# Altium PCB K601-6252双模带屏 VER 1.1 2026 10 16.PcbDoc (part 3 of 12)
Units mm, origin at the board's own origin, x right, y up, seen from the top; angles counter-clockwise.
Board outline 75.02 x 25.73 mm, 2 copper layers (Top Layer, Bottom Layer); 43 components, 67 nets, 219 pads, 157 vias.
Unrouted connection lines stored in the file: 1.
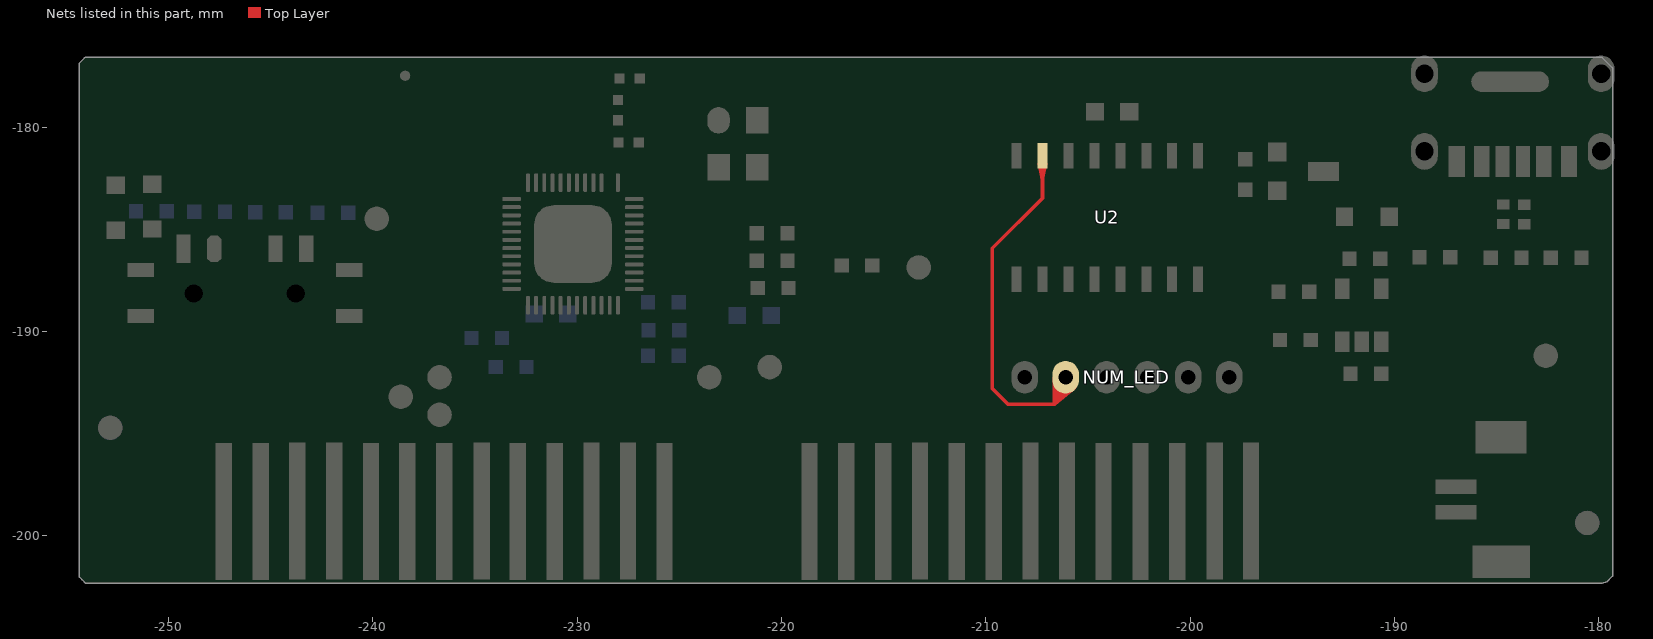
[diagram p3: the nets of this part, all layers, seen from the top]

## Via types
v1: diameter 0.6, hole 0.4, Top Layer to Bottom Layer, tented both sides, 154 vias
v2: diameter 0.6, hole 0.4, Top Layer to Bottom Layer, 3 vias

## Nets (pads, with @x,y where several pads share a name; then routed paths per layer and width w, separated by ;. In a path a pad name is that pad's centre, name@x,y a point inside that pad or via, vN(x,y) a via of type N, cw(c..) or ccw(c..) an arc to the next point about the centre after c; other vN are vias at no path point) (continued)
LED1: (continued)
  Top Layer w0.18: U2.7@-207.225,-181.398 -207.225,-183.482 -209.675,-185.932 -209.675,-192.798 -208.911,-193.562 -206.64,-193.562 ; NUM_LED.5@-206.091,-192.242 -206.091,-193.014 -206.64,-193.562 ; NUM_LED.5@-205.649,-192.736 -206.631,-193.541 ; U2.7@-207.379,-181.793 -207.225,-182.563 ; U2.7@-207.379,-181.793 -207.225,-182.563 ; U2.7@-207.379,-181.793 -207.225,-182.563 ; U2.7@-207.379,-181.793 -207.225,-182.563 ; U2.7@-207.379,-181.793 -207.225,-182.563 ; -207.225,-182.563 U2.7@-207.071,-181.793 ; -207.225,-182.563 U2.7@-207.225,-181.778 ; -207.225,-182.563 U2.7@-207.071,-181.793 ; -207.225,-182.563 U2.7@-207.225,-181.778 ; -207.225,-182.563 U2.7@-207.071,-181.793 ; -207.225,-182.563 U2.7@-207.225,-181.778 ; -207.225,-182.563 U2.7@-207.071,-181.793 ; -207.225,-182.563 U2.7@-207.225,-181.778 ; -207.225,-182.563 U2.7@-207.071,-181.793 ; -207.225,-182.563 U2.7@-207.225,-181.778 ; -206.64,-193.562 NUM_LED.5@-205.647,-192.733 ; -206.64,-193.562 NUM_LED.5@-206.638,-192.269 ; -206.64,-193.562 NUM_LED.5@-205.774,-192.602 ; -206.64,-193.562 NUM_LED.5@-206.455,-192.283 ; -206.64,-193.562 NUM_LED.5@-205.917,-192.49 ; -206.64,-193.562 NUM_LED.5@-206.278,-192.321 ; -206.64,-193.562 NUM_LED.5@-206.091,-192.392 ; -206.64,-193.562 NUM_LED.5@-205.647,-192.733 ; -206.64,-193.562 NUM_LED.5@-206.638,-192.269 ; -206.64,-193.562 NUM_LED.5@-205.774,-192.602 ; -206.64,-193.562 NUM_LED.5@-206.455,-192.283 ; -206.64,-193.562 NUM_LED.5@-205.917,-192.49 ; -206.64,-193.562 NUM_LED.5@-206.278,-192.321 ; -206.64,-193.562 NUM_LED.5@-206.091,-192.392 ; -206.64,-193.562 NUM_LED.5@-205.647,-192.733 ; -206.64,-193.562 NUM_LED.5@-206.638,-192.269 ; -206.64,-193.562 NUM_LED.5@-205.774,-192.602 ; -206.64,-193.562 NUM_LED.5@-206.455,-192.283 ; -206.64,-193.562 NUM_LED.5@-205.917,-192.49 ; -206.64,-193.562 NUM_LED.5@-206.278,-192.321 ; -206.64,-193.562 NUM_LED.5@-206.091,-192.392 ; -206.64,-193.562 NUM_LED.5@-205.647,-192.733 ; -206.64,-193.562 NUM_LED.5@-206.638,-192.269 ; -206.64,-193.562 NUM_LED.5@-205.774,-192.602 ; -206.64,-193.562 NUM_LED.5@-206.455,-192.283 ; -206.64,-193.562 NUM_LED.5@-205.917,-192.49 ; -206.64,-193.562 NUM_LED.5@-206.278,-192.321 ; -206.64,-193.562 NUM_LED.5@-206.091,-192.392 ; -206.64,-193.562 NUM_LED.5@-205.647,-192.733 ; -206.64,-193.562 NUM_LED.5@-206.638,-192.269 ; -206.64,-193.562 NUM_LED.5@-205.774,-192.602 ; -206.64,-193.562 NUM_LED.5@-206.455,-192.283 ; -206.64,-193.562 NUM_LED.5@-205.917,-192.49 ; -206.64,-193.562 NUM_LED.5@-206.278,-192.321 ; -206.64,-193.562 NUM_LED.5@-206.091,-192.392 ; -206.64,-193.562 NUM_LED.5@-205.647,-192.733 ; -206.64,-193.562 NUM_LED.5@-206.638,-192.269 ; -206.64,-193.562 NUM_LED.5@-205.774,-192.602 ; -206.64,-193.562 NUM_LED.5@-206.455,-192.283 ; -206.64,-193.562 NUM_LED.5@-205.917,-192.49 ; -206.64,-193.562 NUM_LED.5@-206.278,-192.321 ; -206.64,-193.562 NUM_LED.5@-206.091,-192.392 ; -206.64,-193.562 NUM_LED.5@-205.647,-192.733 ; -206.64,-193.562 NUM_LED.5@-206.638,-192.269 ; -206.64,-193.562 NUM_LED.5@-205.774,-192.602 ; -206.64,-193.562 NUM_LED.5@-206.455,-192.283 ; -206.64,-193.562 NUM_LED.5@-205.917,-192.49 ; -206.64,-193.562 NUM_LED.5@-206.278,-192.321 ; -206.64,-193.562 NUM_LED.5@-206.091,-192.392 ; -206.64,-193.562 NUM_LED.5@-205.647,-192.733 ; -206.64,-193.562 NUM_LED.5@-206.638,-192.269 ; -206.64,-193.562 NUM_LED.5@-205.774,-192.602 ; -206.64,-193.562 NUM_LED.5@-206.455,-192.283 ; -206.64,-193.562 NUM_LED.5@-205.917,-192.49 ; -206.64,-193.562 NUM_LED.5@-206.278,-192.321 ; -206.64,-193.562 NUM_LED.5@-206.091,-192.392 ; -206.64,-193.562 NUM_LED.5@-205.647,-192.733 ; -206.64,-193.562 NUM_LED.5@-206.638,-192.269 ; -206.64,-193.562 NUM_LED.5@-205.774,-192.602 ; -206.64,-193.562 NUM_LED.5@-206.455,-192.283 ; -206.64,-193.562 NUM_LED.5@-205.917,-192.49 ; -206.64,-193.562 NUM_LED.5@-206.278,-192.321 ; -206.64,-193.562 NUM_LED.5@-206.091,-192.392 ; -206.64,-193.562 NUM_LED.5@-205.647,-192.733 ; -206.64,-193.562 NUM_LED.5@-206.638,-192.269 ; -206.64,-193.562 NUM_LED.5@-205.774,-192.602 ; -206.64,-193.562 NUM_LED.5@-206.455,-192.283 ; -206.64,-193.562 NUM_LED.5@-205.917,-192.49 ; -206.64,-193.562 NUM_LED.5@-206.278,-192.321 ; -206.64,-193.562 NUM_LED.5@-206.091,-192.392 ; -206.64,-193.562 NUM_LED.5@-205.647,-192.733 ; -206.64,-193.562 NUM_LED.5@-206.638,-192.269 ; -206.64,-193.562 NUM_LED.5@-205.774,-192.602 ; -206.64,-193.562 NUM_LED.5@-206.455,-192.283 ; -206.64,-193.562 NUM_LED.5@-205.917,-192.49 ; -206.64,-193.562 NUM_LED.5@-206.278,-192.321 ; -206.64,-193.562 NUM_LED.5@-206.091,-192.392 ; -206.64,-193.562 NUM_LED.5@-205.647,-192.733 ; -206.64,-193.562 NUM_LED.5@-206.638,-192.269 ; -206.64,-193.562 NUM_LED.5@-205.774,-192.602 ; -206.64,-193.562 NUM_LED.5@-206.455,-192.283 ; -206.64,-193.562 NUM_LED.5@-205.917,-192.49 ; -206.64,-193.562 NUM_LED.5@-206.278,-192.321 ; -206.64,-193.562 NUM_LED.5@-206.091,-192.392 ; -206.64,-193.562 NUM_LED.5@-205.647,-192.733 ; -206.64,-193.562 NUM_LED.5@-206.638,-192.269 ; -206.64,-193.562 NUM_LED.5@-205.774,-192.602 ; -206.64,-193.562 NUM_LED.5@-206.455,-192.283 ; -206.64,-193.562 NUM_LED.5@-205.917,-192.49 ; -206.64,-193.562 NUM_LED.5@-206.278,-192.321 ; -206.64,-193.562 NUM_LED.5@-206.091,-192.392 ; -206.64,-193.562 NUM_LED.5@-205.647,-192.733 ; -206.64,-193.562 NUM_LED.5@-206.638,-192.269 ; -206.64,-193.562 NUM_LED.5@-205.774,-192.602 ; -206.64,-193.562 NUM_LED.5@-206.455,-192.283 ; -206.64,-193.562 NUM_LED.5@-205.917,-192.49 ; -206.64,-193.562 NUM_LED.5@-206.278,-192.321 ; -206.64,-193.562 NUM_LED.5@-206.091,-192.392 ; -206.64,-193.562 NUM_LED.5@-205.647,-192.733 ; -206.64,-193.562 NUM_LED.5@-206.638,-192.269 ; -206.64,-193.562 NUM_LED.5@-205.774,-192.602 ; -206.64,-193.562 NUM_LED.5@-206.455,-192.283 ; -206.64,-193.562 NUM_LED.5@-205.917,-192.49 ; -206.64,-193.562 NUM_LED.5@-206.278,-192.321 ; -206.64,-193.562 NUM_LED.5@-206.091,-192.392 ; -206.64,-193.562 NUM_LED.5@-205.647,-192.733 ; -206.64,-193.562 NUM_LED.5@-206.638,-192.269 ; -206.64,-193.562 NUM_LED.5@-205.774,-192.602 ; -206.64,-193.562 NUM_LED.5@-206.455,-192.283 ; -206.64,-193.562 NUM_LED.5@-205.917,-192.49 ; -206.64,-193.562 NUM_LED.5@-206.278,-192.321 ; -206.64,-193.562 NUM_LED.5@-206.091,-192.392 ; -206.64,-193.562 NUM_LED.5@-205.647,-192.733 ; -206.64,-193.562 NUM_LED.5@-206.638,-192.269 ; -206.64,-193.562 NUM_LED.5@-205.774,-192.602 ; -206.64,-193.562 NUM_LED.5@-206.455,-192.283 ; -206.64,-193.562 NUM_LED.5@-205.917,-192.49 ; -206.64,-193.562 NUM_LED.5@-206.278,-192.321 ; -206.64,-193.562 NUM_LED.5@-206.091,-192.392 ; -206.64,-193.562 NUM_LED.5@-205.647,-192.733 ; -206.64,-193.562 NUM_LED.5@-206.638,-192.269 ; -206.64,-193.562 NUM_LED.5@-205.774,-192.602 ; -206.64,-193.562 NUM_LED.5@-206.455,-192.283 ; -206.64,-193.562 NUM_LED.5@-205.917,-192.49 ; -206.64,-193.562 NUM_LED.5@-206.278,-192.321 ; -206.64,-193.562 NUM_LED.5@-206.091,-192.392 ; -206.64,-193.562 NUM_LED.5@-205.647,-192.733 ; -206.64,-193.562 NUM_LED.5@-206.638,-192.269 ; -206.64,-193.562 NUM_LED.5@-205.774,-192.602 ; -206.64,-193.562 NUM_LED.5@-206.455,-192.283 ; -206.64,-193.562 NUM_LED.5@-205.917,-192.49 ; -206.64,-193.562 NUM_LED.5@-206.278,-192.321 ; -206.64,-193.562 NUM_LED.5@-206.091,-192.392 ; -206.64,-193.562 NUM_LED.5@-205.647,-192.733 ; -206.64,-193.562 NUM_LED.5@-206.638,-192.269 ; -206.64,-193.562 NUM_LED.5@-205.774,-192.602 ; -206.64,-193.562 NUM_LED.5@-206.455,-192.283 ; -206.64,-193.562 NUM_LED.5@-205.917,-192.49 ; -206.64,-193.562 NUM_LED.5@-206.278,-192.321 ; -206.64,-193.562 NUM_LED.5@-206.091,-192.392 ; -206.64,-193.562 NUM_LED.5@-205.647,-192.733 ; -206.64,-193.562 NUM_LED.5@-206.638,-192.269 ; -206.64,-193.562 NUM_LED.5@-205.774,-192.602 ; -206.64,-193.562 NUM_LED.5@-206.455,-192.283 ; -206.64,-193.562 NUM_LED.5@-205.917,-192.49 ; -206.64,-193.562 NUM_LED.5@-206.278,-192.321 ; -206.64,-193.562 NUM_LED.5@-206.091,-192.392 ; -206.64,-193.562 NUM_LED.5@-205.647,-192.733 ; -206.64,-193.562 NUM_LED.5@-206.638,-192.269 ; -206.64,-193.562 NUM_LED.5@-205.774,-192.602 ; -206.64,-193.562 NUM_LED.5@-206.455,-192.283 ; -206.64,-193.562 NUM_LED.5@-205.917,-192.49 ; -206.64,-193.562 NUM_LED.5@-206.278,-192.321 ; -206.64,-193.562 NUM_LED.5@-206.091,-192.392 ; -206.64,-193.562 NUM_LED.5@-205.647,-192.733 ; -206.64,-193.562 NUM_LED.5@-206.638,-192.269 ; -206.64,-193.562 NUM_LED.5@-205.774,-192.602 ; -206.64,-193.562 NUM_LED.5@-206.455,-192.283 ; -206.64,-193.562 NUM_LED.5@-205.917,-192.49 ; -206.64,-193.562 NUM_LED.5@-206.278,-192.321 ; -206.64,-193.562 NUM_LED.5@-206.091,-192.392 ; -206.64,-193.562 NUM_LED.5@-205.647,-192.733 ; -206.64,-193.562 NUM_LED.5@-206.638,-192.269 ; -206.64,-193.562 NUM_LED.5@-205.774,-192.602 ; -206.64,-193.562 NUM_LED.5@-206.455,-192.283 ; -206.64,-193.562 NUM_LED.5@-205.917,-192.49 ; -206.64,-193.562 NUM_LED.5@-206.278,-192.321 ; -206.64,-193.562 NUM_LED.5@-206.091,-192.392 ; -206.64,-193.562 NUM_LED.5@-205.647,-192.733 ; -206.64,-193.562 NUM_LED.5@-206.638,-192.269 ; -206.64,-193.562 NUM_LED.5@-205.774,-192.602 ; -206.64,-193.562 NUM_LED.5@-206.455,-192.283 ; -206.64,-193.562 NUM_LED.5@-205.917,-192.49 ; -206.64,-193.562 NUM_LED.5@-206.278,-192.321 ; -206.64,-193.562 NUM_LED.5@-206.091,-192.392 ; -206.64,-193.562 NUM_LED.5@-205.647,-192.733 ; -206.64,-193.562 NUM_LED.5@-206.638,-192.269 ; -206.64,-193.562 NUM_LED.5@-205.774,-192.602 ; -206.64,-193.562 NUM_LED.5@-206.455,-192.283 ; -206.64,-193.562 NUM_LED.5@-205.917,-192.49 ; -206.64,-193.562 NUM_LED.5@-206.278,-192.321 ; -206.64,-193.562 NUM_LED.5@-206.091,-192.392 ; -206.64,-193.562 NUM_LED.5@-205.647,-192.733 ; -206.64,-193.562 NUM_LED.5@-206.638,-192.269 ; -206.64,-193.562 NUM_LED.5@-205.774,-192.602 ; -206.64,-193.562 NUM_LED.5@-206.455,-192.283 ; -206.64,-193.562 NUM_LED.5@-205.917,-192.49 ; -206.64,-193.562 NUM_LED.5@-206.278,-192.321 ; -206.64,-193.562 NUM_LED.5@-206.091,-192.392 ; -206.64,-193.562 NUM_LED.5@-205.647,-192.733 ; -206.64,-193.562 NUM_LED.5@-206.638,-192.269 ; -206.64,-193.562 NUM_LED.5@-205.774,-192.602 ; -206.64,-193.562 NUM_LED.5@-206.455,-192.283 ; -206.64,-193.562 NUM_LED.5@-205.917,-192.49 ; -206.64,-193.562 NUM_LED.5@-206.278,-192.321 ; -206.64,-193.562 NUM_LED.5@-206.091,-192.392 ; -206.64,-193.562 NUM_LED.5@-205.647,-192.733 ; -206.64,-193.562 NUM_LED.5@-206.638,-192.269 ; -206.64,-193.562 NUM_LED.5@-205.774,-192.602 ; -206.64,-193.562 NUM_LED.5@-206.455,-192.283 ; -206.64,-193.562 NUM_LED.5@-205.917,-192.49 ; -206.64,-193.562 NUM_LED.5@-206.278,-192.321 ; -206.64,-193.562 NUM_LED.5@-206.091,-192.392 ; -206.64,-193.562 NUM_LED.5@-205.647,-192.733 ; -206.64,-193.562 NUM_LED.5@-206.638,-192.269 ; -206.64,-193.562 NUM_LED.5@-205.774,-192.602 ; -206.64,-193.562 NUM_LED.5@-206.455,-192.283 ; -206.64,-193.562 NUM_LED.5@-205.917,-192.49 ; -206.64,-193.562 NUM_LED.5@-206.278,-192.321 ; -206.64,-193.562 NUM_LED.5@-206.091,-192.392 ; -206.64,-193.562 NUM_LED.5@-205.647,-192.733 ; -206.64,-193.562 NUM_LED.5@-206.638,-192.269 ; -206.64,-193.562 NUM_LED.5@-205.774,-192.602 ; -206.64,-193.562 NUM_LED.5@-206.455,-192.283 ; -206.64,-193.562 NUM_LED.5@-205.917,-192.49 ; -206.64,-193.562 NUM_LED.5@-206.278,-192.321 ; -206.64,-193.562 NUM_LED.5@-206.091,-192.392 ; -206.64,-193.562 NUM_LED.5@-205.647,-192.733 ; -206.64,-193.562 NUM_LED.5@-206.638,-192.269 ; -206.64,-193.562 NUM_LED.5@-205.774,-192.602 ; -206.64,-193.562 NUM_LED.5@-206.455,-192.283 ; -206.64,-193.562 NUM_LED.5@-205.917,-192.49 ; -206.64,-193.562 NUM_LED.5@-206.278,-192.321 ; -206.64,-193.562 NUM_LED.5@-206.091,-192.392 ; -206.64,-193.562 NUM_LED.5@-205.647,-192.733 ; -206.64,-193.562 NUM_LED.5@-206.638,-192.269 ; -206.64,-193.562 NUM_LED.5@-205.774,-192.602 ; -206.64,-193.562 NUM_LED.5@-206.455,-192.283 ; -206.64,-193.562 NUM_LED.5@-205.917,-192.49 ; -206.64,-193.562 NUM_LED.5@-206.278,-192.321 ; -206.64,-193.562 NUM_LED.5@-206.091,-192.392 ; -206.64,-193.562 NUM_LED.5@-205.647,-192.733 ; -206.64,-193.562 NUM_LED.5@-206.638,-192.269 ; -206.64,-193.562 NUM_LED.5@-205.774,-192.602 ; -206.64,-193.562 NUM_LED.5@-206.455,-192.283 ; -206.64,-193.562 NUM_LED.5@-205.917,-192.49 ; -206.64,-193.562 NUM_LED.5@-206.278,-192.321 ; -206.64,-193.562 NUM_LED.5@-206.091,-192.392 ; -206.64,-193.562 NUM_LED.5@-205.647,-192.733 ; -206.64,-193.562 NUM_LED.5@-206.638,-192.269 ; -206.64,-193.562 NUM_LED.5@-205.774,-192.602 ; -206.64,-193.562 NUM_LED.5@-206.455,-192.283 ; -206.64,-193.562 NUM_LED.5@-205.917,-192.49 ; -206.64,-193.562 NUM_LED.5@-206.278,-192.321 ; -206.64,-193.562 NUM_LED.5@-206.091,-192.392 ; -206.64,-193.562 NUM_LED.5@-205.647,-192.733 ; -206.64,-193.562 NUM_LED.5@-206.638,-192.269 ; -206.64,-193.562 NUM_LED.5@-205.774,-192.602 ; -206.64,-193.562 NUM_LED.5@-206.455,-192.283 ; -206.64,-193.562 NUM_LED.5@-205.917,-192.49 ; -206.64,-193.562 NUM_LED.5@-206.278,-192.321 ; -206.64,-193.562 NUM_LED.5@-206.091,-192.392 ; -206.64,-193.562 NUM_LED.5@-205.647,-192.733 ; -206.64,-193.562 NUM_LED.5@-206.638,-192.269 ; -206.64,-193.562 NUM_LED.5@-205.774,-192.602 ; -206.64,-193.562 NUM_LED.5@-206.455,-192.283 ; -206.64,-193.562 NUM_LED.5@-205.917,-192.49 ; -206.64,-193.562 NUM_LED.5@-206.278,-192.321 ; -206.64,-193.562 NUM_LED.5@-206.091,-192.392 ; -206.64,-193.562 NUM_LED.5@-205.647,-192.733 ; -206.64,-193.562 NUM_LED.5@-206.638,-192.269 ; -206.64,-193.562 NUM_LED.5@-205.774,-192.602 ; -206.64,-193.562 NUM_LED.5@-206.455,-192.283 ; -206.64,-193.562 NUM_LED.5@-205.917,-192.49 ; -206.64,-193.562 NUM_LED.5@-206.278,-192.321 ; -206.64,-193.562 NUM_LED.5@-206.091,-192.392 ; -206.64,-193.562 NUM_LED.5@-205.647,-192.733 ; -206.64,-193.562 NUM_LED.5@-206.638,-192.269 ; -206.64,-193.562 NUM_LED.5@-205.774,-192.602 ; -206.64,-193.562 NUM_LED.5@-206.455,-192.283 ; -206.64,-193.562 NUM_LED.5@-205.917,-192.49 ; -206.64,-193.562 NUM_LED.5@-206.278,-192.321 ; -206.64,-193.562 NUM_LED.5@-206.091,-192.392 ; -206.64,-193.562 NUM_LED.5@-205.647,-192.733 ; -206.64,-193.562 NUM_LED.5@-206.638,-192.269 ; -206.64,-193.562 NUM_LED.5@-205.774,-192.602 ; -206.64,-193.562 NUM_LED.5@-206.455,-192.283 ; -206.64,-193.562 NUM_LED.5@-205.917,-192.49 ; -206.64,-193.562 NUM_LED.5@-206.278,-192.321 ; -206.64,-193.562 NUM_LED.5@-206.091,-192.392 ; -206.64,-193.562 NUM_LED.5@-205.647,-192.733 ; -206.64,-193.562 NUM_LED.5@-206.638,-192.269 ; -206.64,-193.562 NUM_LED.5@-205.774,-192.602 ; -206.64,-193.562 NUM_LED.5@-206.455,-192.283 ; -206.64,-193.562 NUM_LED.5@-205.917,-192.49 ; -206.64,-193.562 NUM_LED.5@-206.278,-192.321 ; -206.64,-193.562 NUM_LED.5@-206.091,-192.392 ; -206.64,-193.562 NUM_LED.5@-205.647,-192.733 ; -206.64,-193.562 NUM_LED.5@-206.638,-192.269 ; -206.64,-193.562 NUM_LED.5@-205.774,-192.602 ; -206.64,-193.562 NUM_LED.5@-206.455,-192.283 ; -206.64,-193.562 NUM_LED.5@-205.917,-192.49 ; -206.64,-193.562 NUM_LED.5@-206.278,-192.321 ; -206.64,-193.562 NUM_LED.5@-206.091,-192.392 ; -206.64,-193.562 NUM_LED.5@-205.647,-192.733 ; -206.64,-193.562 NUM_LED.5@-206.638,-192.269 ; -206.64,-193.562 NUM_LED.5@-205.774,-192.602 ; -206.64,-193.562 NUM_LED.5@-206.455,-192.283 ; -206.64,-193.562 NUM_LED.5@-205.917,-192.49 ; -206.64,-193.562 NUM_LED.5@-206.278,-192.321 ; -206.64,-193.562 NUM_LED.5@-206.091,-192.392 ; -206.64,-193.562 NUM_LED.5@-205.647,-192.733 ; -206.64,-193.562 NUM_LED.5@-206.638,-192.269 ; -206.64,-193.562 NUM_LED.5@-205.774,-192.602 ; -206.64,-193.562 NUM_LED.5@-206.455,-192.283 ; -206.64,-193.562 NUM_LED.5@-205.917,-192.49 ; -206.64,-193.562 NUM_LED.5@-206.278,-192.321 ; -206.64,-193.562 NUM_LED.5@-206.091,-192.392 ; -206.64,-193.562 NUM_LED.5@-205.647,-192.733 ; -206.64,-193.562 NUM_LED.5@-206.638,-192.269 ; -206.64,-193.562 NUM_LED.5@-205.774,-192.602 ; -206.64,-193.562 NUM_LED.5@-206.455,-192.283 ; -206.64,-193.562 NUM_LED.5@-205.917,-192.49 ; -206.64,-193.562 NUM_LED.5@-206.278,-192.321 ; -206.64,-193.562 NUM_LED.5@-206.091,-192.392 ; -206.64,-193.562 NUM_LED.5@-205.647,-192.733 ; -206.64,-193.562 NUM_LED.5@-206.638,-192.269 ; -206.64,-193.562 NUM_LED.5@-205.774,-192.602 ; -206.64,-193.562 NUM_LED.5@-206.455,-192.283 ; -206.64,-193.562 NUM_LED.5@-205.917,-192.49 ; -206.64,-193.562 NUM_LED.5@-206.278,-192.321 ; -206.64,-193.562 NUM_LED.5@-206.091,-192.392 ; -206.64,-193.562 NUM_LED.5@-205.647,-192.733 ; -206.64,-193.562 NUM_LED.5@-206.638,-192.269 ; -206.64,-193.562 NUM_LED.5@-205.774,-192.602 ; -206.64,-193.562 NUM_LED.5@-206.455,-192.283 ; -206.64,-193.562 NUM_LED.5@-205.917,-192.49 ; -206.64,-193.562 NUM_LED.5@-206.278,-192.321 ; -206.64,-193.562 NUM_LED.5@-206.091,-192.392 ; -206.64,-193.562 NUM_LED.5@-205.647,-192.733 ; -206.64,-193.562 NUM_LED.5@-206.638,-192.269 ; -206.64,-193.562 NUM_LED.5@-205.774,-192.602 ; -206.64,-193.562 NUM_LED.5@-206.455,-192.283 ; -206.64,-193.562 NUM_LED.5@-205.917,-192.49 ; -206.64,-193.562 NUM_LED.5@-206.278,-192.321 ; -206.64,-193.562 NUM_LED.5@-206.091,-192.392 ; -206.64,-193.562 NUM_LED.5@-205.647,-192.733 ; -206.64,-193.562 NUM_LED.5@-206.638,-192.269 ; -206.64,-193.562 NUM_LED.5@-205.774,-192.602 ; -206.64,-193.562 NUM_LED.5@-206.455,-192.283 ; -206.64,-193.562 NUM_LED.5@-205.917,-192.49 ; -206.64,-193.562 NUM_LED.5@-206.278,-192.321 ; -206.64,-193.562 NUM_LED.5@-206.091,-192.392 ; -206.64,-193.562 NUM_LED.5@-205.647,-192.733 ; -206.64,-193.562 NUM_LED.5@-206.638,-192.269 ; -206.64,-193.562 NUM_LED.5@-205.774,-192.602 ; -206.64,-193.562 NUM_LED.5@-206.455,-192.283 ; -206.64,-193.562 NUM_LED.5@-205.917,-192.49 ; -206.64,-193.562 NUM_LED.5@-206.278,-192.321 ; -206.64,-193.562 NUM_LED.5@-206.091,-192.392 ; -206.64,-193.562 NUM_LED.5@-205.647,-192.733 ; -206.64,-193.562 NUM_LED.5@-206.638,-192.269 ; -206.64,-193.562 NUM_LED.5@-205.774,-192.602 ; -206.64,-193.562 NUM_LED.5@-206.455,-192.283 ; -206.64,-193.562 NUM_LED.5@-205.917,-192.49 ; -206.64,-193.562 NUM_LED.5@-206.278,-192.321 ; -206.64,-193.562 NUM_LED.5@-206.091,-192.392 ; -206.64,-193.562 NUM_LED.5@-205.647,-192.733 ; -206.64,-193.562 NUM_LED.5@-206.638,-192.269 ; -206.64,-193.562 NUM_LED.5@-205.774,-192.602 ; -206.64,-193.562 NUM_LED.5@-206.455,-192.283 ; -206.64,-193.562 NUM_LED.5@-205.917,-192.49 ; -206.64,-193.562 NUM_LED.5@-206.278,-192.321 ; -206.64,-193.562 NUM_LED.5@-206.091,-192.392 ; -206.64,-193.562 NUM_LED.5@-205.647,-192.733 ; -206.64,-193.562 NUM_LED.5@-206.638,-192.269 ; -206.64,-193.562 NUM_LED.5@-205.774,-192.602 ; -206.64,-193.562 NUM_LED.5@-206.455,-192.283 ; -206.64,-193.562 NUM_LED.5@-205.917,-192.49 ; -206.64,-193.562 NUM_LED.5@-206.278,-192.321 ; -206.64,-193.562 NUM_LED.5@-206.091,-192.392 ; -206.64,-193.562 NUM_LED.5@-205.647,-192.733 ; -206.64,-193.562 NUM_LED.5@-206.638,-192.269 ; -206.64,-193.562 NUM_LED.5@-205.774,-192.602 ; -206.64,-193.562 NUM_LED.5@-206.455,-192.283 ; -206.64,-193.562 NUM_LED.5@-205.917,-192.49 ; -206.64,-193.562 NUM_LED.5@-206.278,-192.321 ; -206.64,-193.562 NUM_LED.5@-206.091,-192.392 ; -206.64,-193.562 NUM_LED.5@-205.647,-192.733 ; -206.64,-193.562 NUM_LED.5@-206.638,-192.269 ; -206.64,-193.562 NUM_LED.5@-205.774,-192.602 ; -206.64,-193.562 NUM_LED.5@-206.455,-192.283 ; -206.64,-193.562 NUM_LED.5@-205.917,-192.49 ; -206.64,-193.562 NUM_LED.5@-206.278,-192.321 ; -206.64,-193.562 NUM_LED.5@-206.091,-192.392 ; -206.64,-193.562 NUM_LED.5@-205.647,-192.733 ; -206.64,-193.562 NUM_LED.5@-206.638,-192.269 ; -206.64,-193.562 NUM_LED.5@-205.774,-192.602 ; -206.64,-193.562 NUM_LED.5@-206.455,-192.283 ; -206.64,-193.562 NUM_LED.5@-205.917,-192.49 ; -206.64,-193.562 NUM_LED.5@-206.278,-192.321 ; -206.64,-193.562 NUM_LED.5@-206.091,-192.392 ; -206.64,-193.562 NUM_LED.5@-205.647,-192.733 ; -206.64,-193.562 NUM_LED.5@-206.638,-192.269 ; -206.64,-193.562 NUM_LED.5@-205.774,-192.602 ; -206.64,-193.562 NUM_LED.5@-206.455,-192.283 ; -206.64,-193.562 NUM_LED.5@-205.917,-192.49 ; -206.64,-193.562 NUM_LED.5@-206.278,-192.321 ; -206.64,-193.562 NUM_LED.5@-206.091,-192.392 ; -206.64,-193.562 NUM_LED.5@-205.647,-192.733 ; -206.64,-193.562 NUM_LED.5@-206.638,-192.269 ; -206.64,-193.562 NUM_LED.5@-205.774,-192.602 ; -206.64,-193.562 NUM_LED.5@-206.455,-192.283 ; -206.64,-193.562 NUM_LED.5@-205.917,-192.49 ; -206.64,-193.562 NUM_LED.5@-206.278,-192.321 ; -206.64,-193.562 NUM_LED.5@-206.091,-192.392 ; -206.64,-193.562 NUM_LED.5@-205.647,-192.733 ; -206.64,-193.562 NUM_LED.5@-206.638,-192.269 ; -206.64,-193.562 NUM_LED.5@-205.774,-192.602 ; -206.64,-193.562 NUM_LED.5@-206.455,-192.283 ; -206.64,-193.562 NUM_LED.5@-205.917,-192.49 ; -206.64,-193.562 NUM_LED.5@-206.278,-192.321 ; -206.64,-193.562 NUM_LED.5@-206.091,-192.392 ; -206.64,-193.562 NUM_LED.5@-205.647,-192.733 ; -206.64,-193.562 NUM_LED.5@-206.638,-192.269 ; -206.64,-193.562 NUM_LED.5@-205.774,-192.602 ; -206.64,-193.562 NUM_LED.5@-206.455,-192.283 ; -206.64,-193.562 NUM_LED.5@-205.917,-192.49 ; -206.64,-193.562 NUM_LED.5@-206.278,-192.321 ; -206.64,-193.562 NUM_LED.5@-206.091,-192.392 ; -206.64,-193.562 NUM_LED.5@-205.647,-192.733 ; -206.64,-193.562 NUM_LED.5@-206.638,-192.269 ; -206.64,-193.562 NUM_LED.5@-205.774,-192.602 ; -206.64,-193.562 NUM_LED.5@-206.455,-192.283 ; -206.64,-193.562 NUM_LED.5@-205.917,-192.49 ; -206.64,-193.562 NUM_LED.5@-206.278,-192.321 ; -206.64,-193.562 NUM_LED.5@-206.091,-192.392 ; -206.64,-193.562 NUM_LED.5@-205.647,-192.733 ; -206.64,-193.562 NUM_LED.5@-206.638,-192.269 ; -206.64,-193.562 NUM_LED.5@-205.774,-192.602 ; -206.64,-193.562 NUM_LED.5@-206.455,-192.283 ; -206.64,-193.562 NUM_LED.5@-205.917,-192.49 ; -206.64,-193.562 NUM_LED.5@-206.278,-192.321 ; -206.64,-193.562 NUM_LED.5@-206.091,-192.392 ; -206.64,-193.562 NUM_LED.5@-205.647,-192.733 ; -206.64,-193.562 NUM_LED.5@-206.638,-192.269 ; -206.64,-193.562 NUM_LED.5@-205.774,-192.602 ; -206.64,-193.562 NUM_LED.5@-206.455,-192.283 ; -206.64,-193.562 NUM_LED.5@-205.917,-192.49 ; -206.64,-193.562 NUM_LED.5@-206.278,-192.321 ; -206.64,-193.562 NUM_LED.5@-206.091,-192.392 ; -206.64,-193.562 NUM_LED.5@-205.647,-192.733 ; -206.64,-193.562 NUM_LED.5@-206.638,-192.269 ; -206.64,-193.562 NUM_LED.5@-205.774,-192.602 ; -206.64,-193.562 NUM_LED.5@-206.455,-192.283 ; -206.64,-193.562 NUM_LED.5@-205.917,-192.49 ; -206.64,-193.562 NUM_LED.5@-206.278,-192.321 ; -206.64,-193.562 NUM_LED.5@-206.091,-192.392 ; -206.64,-193.562 NUM_LED.5@-205.647,-192.733 ; -206.64,-193.562 NUM_LED.5@-206.638,-192.269 ; -206.64,-193.562 NUM_LED.5@-205.774,-192.602 ; -206.64,-193.562 NUM_LED.5@-206.455,-192.283 ; -206.64,-193.562 NUM_LED.5@-205.917,-192.49 ; -206.64,-193.562 NUM_LED.5@-206.278,-192.321 ; -206.64,-193.562 NUM_LED.5@-206.091,-192.392 ; -206.64,-193.562 NUM_LED.5@-205.647,-192.733 ; -206.64,-193.562 NUM_LED.5@-206.638,-192.269 ; -206.64,-193.562 NUM_LED.5@-205.774,-192.602 ; -206.64,-193.562 NUM_LED.5@-206.455,-192.283 ; -206.64,-193.562 NUM_LED.5@-205.917,-192.49 ; -206.64,-193.562 NUM_LED.5@-206.278,-192.321 ; -206.64,-193.562 NUM_LED.5@-206.091,-192.392 ; -206.64,-193.562 NUM_LED.5@-205.647,-192.733 ; -206.64,-193.562 NUM_LED.5@-206.638,-192.269 ; -206.64,-193.562 NUM_LED.5@-205.774,-192.602 ; -206.64,-193.562 NUM_LED.5@-206.455,-192.283 ; -206.64,-193.562 NUM_LED.5@-205.917,-192.49 ; -206.64,-193.562 NUM_LED.5@-206.278,-192.321 ; -206.64,-193.562 NUM_LED.5@-206.091,-192.392 ; -206.64,-193.562 NUM_LED.5@-205.647,-192.733 ; -206.64,-193.562 NUM_LED.5@-206.638,-192.269 ; -206.64,-193.562 NUM_LED.5@-205.774,-192.602 ; -206.64,-193.562 NUM_LED.5@-206.455,-192.283 ; -206.64,-193.562 NUM_LED.5@-205.917,-192.49 ; -206.64,-193.562 NUM_LED.5@-206.278,-192.321 ; -206.64,-193.562 NUM_LED.5@-206.091,-192.392 ; -206.64,-193.562 NUM_LED.5@-205.647,-192.733 ; -206.64,-193.562 NUM_LED.5@-206.638,-192.269 ; -206.64,-193.562 NUM_LED.5@-205.774,-192.602 ; -206.64,-193.562 NUM_LED.5@-206.455,-192.283 ; -206.64,-193.562 NUM_LED.5@-205.917,-192.49 ; -206.64,-193.562 NUM_LED.5@-206.278,-192.321 ; -206.64,-193.562 NUM_LED.5@-206.091,-192.392 ; -206.64,-193.562 NUM_LED.5@-205.647,-192.733 ; -206.64,-193.562 NUM_LED.5@-206.638,-192.269 ; -206.64,-193.562 NUM_LED.5@-205.774,-192.602 ; -206.64,-193.562 NUM_LED.5@-206.455,-192.283 ; -206.64,-193.562 NUM_LED.5@-205.917,-192.49 ; -206.64,-193.562 NUM_LED.5@-206.278,-192.321 ; -206.64,-193.562 NUM_LED.5@-206.091,-192.392 ; -206.64,-193.562 NUM_LED.5@-205.647,-192.733 ; -206.64,-193.562 NUM_LED.5@-206.638,-192.269 ; -206.64,-193.562 NUM_LED.5@-205.774,-192.602 ; -206.64,-193.562 NUM_LED.5@-206.455,-192.283 ; -206.64,-193.562 NUM_LED.5@-205.917,-192.49 ; -206.64,-193.562 NUM_LED.5@-206.278,-192.321 ; -206.64,-193.562 NUM_LED.5@-206.091,-192.392 ; -206.64,-193.562 NUM_LED.5@-205.647,-192.733 ; -206.64,-193.562 NUM_LED.5@-206.638,-192.269 ; -206.64,-193.562 NUM_LED.5@-205.774,-192.602 ; -206.64,-193.562 NUM_LED.5@-206.455,-192.283 ; -206.64,-193.562 NUM_LED.5@-205.917,-192.49 ; -206.64,-193.562 NUM_LED.5@-206.278,-192.321 ; -206.64,-193.562 NUM_LED.5@-206.091,-192.392 ; -206.64,-193.562 NUM_LED.5@-205.647,-192.733 ; -206.64,-193.562 NUM_LED.5@-206.638,-192.269 ; -206.64,-193.562 NUM_LED.5@-205.774,-192.602 ; -206.64,-193.562 NUM_LED.5@-206.455,-192.283 ; -206.64,-193.562 NUM_LED.5@-205.917,-192.49 ; -206.64,-193.562 NUM_LED.5@-206.278,-192.321 ; -206.64,-193.562 NUM_LED.5@-206.091,-192.392 ; -206.64,-193.562 NUM_LED.5@-205.647,-192.733 ; -206.64,-193.562 NUM_LED.5@-206.638,-192.269 ; -206.64,-193.562 NUM_LED.5@-205.774,-192.602 ; -206.64,-193.562 NUM_LED.5@-206.455,-192.283 ; -206.64,-193.562 NUM_LED.5@-205.917,-192.49 ; -206.64,-193.562 NUM_LED.5@-206.278,-192.321 ; -206.64,-193.562 NUM_LED.5@-206.091,-192.392 ; -206.64,-193.562 NUM_LED.5@-205.647,-192.733 ; -206.64,-193.562 NUM_LED.5@-206.638,-192.269 ; -206.64,-193.562 NUM_LED.5@-205.774,-192.602 ; -206.64,-193.562 NUM_LED.5@-206.455,-192.283 ; -206.64,-193.562 NUM_LED.5@-205.917,-192.49 ; -206.64,-193.562 NUM_LED.5@-206.278,-192.321 ; -206.64,-193.562 NUM_LED.5@-206.091,-192.392 ; -206.64,-193.562 NUM_LED.5@-205.647,-192.733 ; -206.64,-193.562 NUM_LED.5@-206.638,-192.269 ; -206.64,-193.562 NUM_LED.5@-205.774,-192.602 ; -206.64,-193.562 NUM_LED.5@-206.455,-192.283 ; -206.64,-193.562 NUM_LED.5@-205.917,-192.49 ; -206.64,-193.562 NUM_LED.5@-206.278,-192.321 ; -206.64,-193.562 NUM_LED.5@-206.091,-192.392 ; -206.64,-193.562 NUM_LED.5@-205.647,-192.733 ; -206.64,-193.562 NUM_LED.5@-206.638,-192.269 ; -206.64,-193.562 NUM_LED.5@-205.774,-192.602 ; -206.64,-193.562 NUM_LED.5@-206.455,-192.283 ; -206.64,-193.562 NUM_LED.5@-205.917,-192.49 ; -206.64,-193.562 NUM_LED.5@-206.278,-192.321 ; -206.64,-193.562 NUM_LED.5@-206.091,-192.392 ; -206.64,-193.562 NUM_LED.5@-205.647,-192.733 ; -206.64,-193.562 NUM_LED.5@-206.638,-192.269 ; -206.64,-193.562 NUM_LED.5@-205.774,-192.602 ; -206.64,-193.562 NUM_LED.5@-206.455,-192.283 ; -206.64,-193.562 NUM_LED.5@-205.917,-192.49 ; -206.64,-193.562 NUM_LED.5@-206.278,-192.321 ; -206.64,-193.562 NUM_LED.5@-206.091,-192.392 ; -206.64,-193.562 NUM_LED.5@-205.647,-192.733 ; -206.64,-193.562 NUM_LED.5@-206.638,-192.269 ; -206.64,-193.562 NUM_LED.5@-205.774,-192.602 ; -206.64,-193.562 NUM_LED.5@-206.455,-192.283 ; -206.64,-193.562 NUM_LED.5@-205.917,-192.49 ; -206.64,-193.562 NUM_LED.5@-206.278,-192.321 ; -206.64,-193.562 NUM_LED.5@-206.091,-192.392 ; -206.64,-193.562 NUM_LED.5@-205.647,-192.733 ; -206.64,-193.562 NUM_LED.5@-206.638,-192.269 ; -206.64,-193.562 NUM_LED.5@-205.774,-192.602 ; -206.64,-193.562 NUM_LED.5@-206.455,-192.283 ; -206.64,-193.562 NUM_LED.5@-205.917,-192.49 ; -206.64,-193.562 NUM_LED.5@-206.278,-192.321 ; -206.64,-193.562 NUM_LED.5@-206.091,-192.392 ; -206.64,-193.562 NUM_LED.5@-205.647,-192.733 ; -206.64,-193.562 NUM_LED.5@-206.638,-192.269 ; -206.64,-193.562 NUM_LED.5@-205.774,-192.602 ; -206.64,-193.562 NUM_LED.5@-206.455,-192.283 ; -206.64,-193.562 NUM_LED.5@-205.917,-192.49 ; -206.64,-193.562 NUM_LED.5@-206.278,-192.321 ; -206.64,-193.562 NUM_LED.5@-206.091,-192.392 ; -206.64,-193.562 NUM_LED.5@-205.647,-192.733 ; -206.64,-193.562 NUM_LED.5@-206.638,-192.269 ; -206.64,-193.562 NUM_LED.5@-205.774,-192.602 ; -206.64,-193.562 NUM_LED.5@-206.455,-192.283 ; -206.64,-193.562 NUM_LED.5@-205.917,-192.49 ; -206.64,-193.562 NUM_LED.5@-206.278,-192.321 ; -206.64,-193.562 NUM_LED.5@-206.091,-192.392 ; -206.64,-193.562 NUM_LED.5@-205.647,-192.733 ; -206.64,-193.562 NUM_LED.5@-206.638,-192.269 ; -206.64,-193.562 NUM_LED.5@-205.774,-192.602 ; -206.64,-193.562 NUM_LED.5@-206.455,-192.283 ; -206.64,-193.562 NUM_LED.5@-205.917,-192.49 ; -206.64,-193.562 NUM_LED.5@-206.278,-192.321 ; -206.64,-193.562 NUM_LED.5@-206.091,-192.392 ; -206.64,-193.562 NUM_LED.5@-205.647,-192.733 ; -206.64,-193.562 NUM_LED.5@-206.638,-192.269 ; -206.64,-193.562 NUM_LED.5@-205.774,-192.602 ; -206.64,-193.562 NUM_LED.5@-206.455,-192.283 ; -206.64,-193.562 NUM_LED.5@-205.917,-192.49 ; -206.64,-193.562 NUM_LED.5@-206.278,-192.321 ; -206.64,-193.562 NUM_LED.5@-206.091,-192.392 ; -206.64,-193.562 NUM_LED.5@-205.647,-192.733 ; -206.64,-193.562 NUM_LED.5@-206.638,-192.269 ; -206.64,-193.562 NUM_LED.5@-205.774,-192.602 ; -206.64,-193.562 NUM_LED.5@-206.455,-192.283 ; -206.64,-193.562 NUM_LED.5@-205.917,-192.49 ; -206.64,-193.562 NUM_LED.5@-206.278,-192.321 ; -206.64,-193.562 NUM_LED.5@-206.091,-192.392 ; -206.64,-193.562 NUM_LED.5@-205.647,-192.733 ; -206.64,-193.562 NUM_LED.5@-206.638,-192.269 ; -206.64,-193.562 NUM_LED.5@-205.774,-192.602 ; -206.64,-193.562 NUM_LED.5@-206.455,-192.283 ; -206.64,-193.562 NUM_LED.5@-205.917,-192.49 ; -206.64,-193.562 NUM_LED.5@-206.278,-192.321 ; -206.64,-193.562 NUM_LED.5@-206.091,-192.392 ; -206.64,-193.562 NUM_LED.5@-205.647,-192.733 ; -206.64,-193.562 NUM_LED.5@-206.638,-192.269 ; -206.64,-193.562 NUM_LED.5@-205.774,-192.602 ; -206.64,-193.562 NUM_LED.5@-206.455,-192.283 ; -206.64,-193.562 NUM_LED.5@-205.917,-192.49 ; -206.64,-193.562 NUM_LED.5@-206.278,-192.321 ; -206.64,-193.562 NUM_LED.5@-206.091,-192.392 ; -206.64,-193.562 NUM_LED.5@-205.647,-192.733 ; -206.64,-193.562 NUM_LED.5@-206.638,-192.269 ; -206.64,-193.562 NUM_LED.5@-205.774,-192.602 ; -206.64,-193.562 NUM_LED.5@-206.455,-192.283 ; -206.64,-193.562 NUM_LED.5@-205.917,-192.49 ; -206.64,-193.562 NUM_LED.5@-206.278,-192.321 ; -206.64,-193.562 NUM_LED.5@-206.091,-192.392 ; -206.64,-193.562 NUM_LED.5@-205.647,-192.733 ; -206.64,-193.562 NUM_LED.5@-206.638,-192.269 ; -206.64,-193.562 NUM_LED.5@-205.774,-192.602 ; -206.64,-193.562 NUM_LED.5@-206.455,-192.283 ; -206.64,-193.562 NUM_LED.5@-205.917,-192.49 ; -206.64,-193.562 NUM_LED.5@-206.278,-192.321 ; -206.64,-193.562 NUM_LED.5@-206.091,-192.392 ; -206.64,-193.562 NUM_LED.5@-205.647,-192.733 ; -206.64,-193.562 NUM_LED.5@-206.638,-192.269 ; -206.64,-193.562 NUM_LED.5@-205.774,-192.602 ; -206.64,-193.562 NUM_LED.5@-206.455,-192.283 ; -206.64,-193.562 NUM_LED.5@-205.917,-192.49 ; -206.64,-193.562 NUM_LED.5@-206.278,-192.321 ; -206.64,-193.562 NUM_LED.5@-206.091,-192.392 ; -206.64,-193.562 NUM_LED.5@-205.647,-192.733 ; -206.64,-193.562 NUM_LED.5@-206.638,-192.269 ; -206.64,-193.562 NUM_LED.5@-205.774,-192.602 ; -206.64,-193.562 NUM_LED.5@-206.455,-192.283 ; -206.64,-193.562 NUM_LED.5@-205.917,-192.49 ; -206.64,-193.562 NUM_LED.5@-206.278,-192.321 ; -206.64,-193.562 NUM_LED.5@-206.091,-192.392 ; -206.64,-193.562 NUM_LED.5@-205.647,-192.733 ; -206.64,-193.562 NUM_LED.5@-206.638,-192.269 ; -206.64,-193.562 NUM_LED.5@-205.774,-192.602 ; -206.64,-193.562 NUM_LED.5@-206.455,-192.283 ; -206.64,-193.562 NUM_LED.5@-205.917,-192.49 ; -206.64,-193.562 NUM_LED.5@-206.278,-192.321 ; -206.64,-193.562 NUM_LED.5@-206.091,-192.392 ; -206.64,-193.562 NUM_LED.5@-205.647,-192.733 ; -206.64,-193.562 NUM_LED.5@-206.638,-192.269 ; -206.64,-193.562 NUM_LED.5@-205.774,-192.602 ; -206.64,-193.562 NUM_LED.5@-206.455,-192.283 ; -206.64,-193.562 NUM_LED.5@-205.917,-192.49 ; -206.64,-193.562 NUM_LED.5@-206.278,-192.321 ; -206.64,-193.562 NUM_LED.5@-206.091,-192.392 ; -206.64,-193.562 NUM_LED.5@-205.647,-192.733 ; -206.64,-193.562 NUM_LED.5@-206.638,-192.269 ; -206.64,-193.562 NUM_LED.5@-205.774,-192.602 ; -206.64,-193.562 NUM_LED.5@-206.455,-192.283 ; -206.64,-193.562 NUM_LED.5@-205.917,-192.49 ; -206.64,-193.562 NUM_LED.5@-206.278,-192.321 ; -206.64,-193.562 NUM_LED.5@-206.091,-192.392 ; -206.64,-193.562 NUM_LED.5@-205.647,-192.733 ; -206.64,-193.562 NUM_LED.5@-206.638,-192.269 ; -206.64,-193.562 NUM_LED.5@-205.774,-192.602 ; -206.64,-193.562 NUM_LED.5@-206.455,-192.283 ; -206.64,-193.562 NUM_LED.5@-205.917,-192.49 ; -206.64,-193.562 NUM_LED.5@-206.278,-192.321 ; -206.64,-193.562 NUM_LED.5@-206.091,-192.392 ; -206.64,-193.562 NUM_LED.5@-205.647,-192.733 ; -206.64,-193.562 NUM_LED.5@-206.638,-192.269 ; -206.64,-193.562 NUM_LED.5@-205.774,-192.602 ; -206.64,-193.562 NUM_LED.5@-206.455,-192.283 ; -206.64,-193.562 NUM_LED.5@-205.917,-192.49 ; -206.64,-193.562 NUM_LED.5@-206.278,-192.321 ; -206.64,-193.562 NUM_LED.5@-206.091,-192.392 ; -206.64,-193.562 NUM_LED.5@-205.647,-192.733 ; -206.64,-193.562 NUM_LED.5@-206.638,-192.269 ; -206.64,-193.562 NUM_LED.5@-205.774,-192.602 ; -206.64,-193.562 NUM_LED.5@-206.455,-192.283 ; -206.64,-193.562 NUM_LED.5@-205.917,-192.49 ; -206.64,-193.562 NUM_LED.5@-206.278,-192.321 ; -206.64,-193.562 NUM_LED.5@-206.091,-192.392 ; -206.64,-193.562 NUM_LED.5@-205.647,-192.733 ; -206.64,-193.562 NUM_LED.5@-206.638,-192.269 ; -206.64,-193.562 NUM_LED.5@-205.774,-192.602 ; -206.64,-193.562 NUM_LED.5@-206.455,-192.283 ; -206.64,-193.562 NUM_LED.5@-205.917,-192.49 ; -206.64,-193.562 NUM_LED.5@-206.278,-192.321 ; -206.64,-193.562 NUM_LED.5@-206.091,-192.392 ; -206.64,-193.562 NUM_LED.5@-205.647,-192.733 ; -206.64,-193.562 NUM_LED.5@-206.638,-192.269 ; -206.64,-193.562 NUM_LED.5@-205.774,-192.602 ; -206.64,-193.562 NUM_LED.5@-206.455,-192.283 ; -206.64,-193.562 NUM_LED.5@-205.917,-192.49 ; -206.64,-193.562 NUM_LED.5@-206.278,-192.321 ; -206.64,-193.562 NUM_LED.5@-206.091,-192.392 ; -206.64,-193.562 NUM_LED.5@-205.647,-192.733 ; -206.64,-193.562 NUM_LED.5@-206.638,-192.269 ; -206.64,-193.562 NUM_LED.5@-205.774,-192.602 ; -206.64,-193.562 NUM_LED.5@-206.455,-192.283 ; -206.64,-193.562 NUM_LED.5@-205.917,-192.49 ; -206.64,-193.562 NUM_LED.5@-206.278,-192.321 ; -206.64,-193.562 NUM_LED.5@-206.091,-192.392 ; -206.64,-193.562 NUM_LED.5@-205.647,-192.733 ; -206.64,-193.562 NUM_LED.5@-206.638,-192.269 ; -206.64,-193.562 NUM_LED.5@-205.774,-192.602 ; -206.64,-193.562 NUM_LED.5@-206.455,-192.283 ; -206.64,-193.562 NUM_LED.5@-205.917,-192.49 ; -206.64,-193.562 NUM_LED.5@-206.278,-192.321 ; -206.64,-193.562 NUM_LED.5@-206.091,-192.392 ; -206.64,-193.562 NUM_LED.5@-205.647,-192.733 ; -206.64,-193.562 NUM_LED.5@-206.638,-192.269 ; -206.64,-193.562 NUM_LED.5@-205.774,-192.602 ; -206.64,-193.562 NUM_LED.5@-206.455,-192.283 ; -206.64,-193.562 NUM_LED.5@-205.917,-192.49 ; -206.64,-193.562 NUM_LED.5@-206.278,-192.321 ; -206.64,-193.562 NUM_LED.5@-206.091,-192.392 ; -206.64,-193.562 NUM_LED.5@-205.647,-192.733 ; -206.64,-193.562 NUM_LED.5@-206.638,-192.269 ; -206.64,-193.562 NUM_LED.5@-205.774,-192.602 ; -206.64,-193.562 NUM_LED.5@-206.455,-192.283 ; -206.64,-193.562 NUM_LED.5@-205.917,-192.49 ; -206.64,-193.562 NUM_LED.5@-206.278,-192.321 ; -206.64,-193.562 NUM_LED.5@-206.091,-192.392 ; -206.64,-193.562 NUM_LED.5@-205.647,-192.733 ; -206.64,-193.562 NUM_LED.5@-206.638,-192.269 ; -206.64,-193.562 NUM_LED.5@-205.774,-192.602 ; -206.64,-193.562 NUM_LED.5@-206.455,-192.283 ; -206.64,-193.562 NUM_LED.5@-205.917,-192.49 ; -206.64,-193.562 NUM_LED.5@-206.278,-192.321 ; -206.64,-193.562 NUM_LED.5@-206.091,-192.392 ; -206.64,-193.562 NUM_LED.5@-205.647,-192.733 ; -206.64,-193.562 NUM_LED.5@-206.638,-192.269 ; -206.64,-193.562 NUM_LED.5@-205.774,-192.602 ; -206.64,-193.562 NUM_LED.5@-206.455,-192.283 ; -206.64,-193.562 NUM_LED.5@-205.917,-192.49 ; -206.64,-193.562 NUM_LED.5@-206.278,-192.321 ; -206.64,-193.562 NUM_LED.5@-206.091,-192.392 ; -206.64,-193.562 NUM_LED.5@-205.647,-192.733 ; -206.64,-193.562 NUM_LED.5@-206.638,-192.269 ; -206.64,-193.562 NUM_LED.5@-205.774,-192.602 ; -206.64,-193.562 NUM_LED.5@-206.455,-192.283 ; -206.64,-193.562 NUM_LED.5@-205.917,-192.49 ; -206.64,-193.562 NUM_LED.5@-206.278,-192.321 ; -206.64,-193.562 NUM_LED.5@-206.091,-192.392 ; -206.64,-193.562 NUM_LED.5@-205.647,-192.733 ; -206.64,-193.562 NUM_LED.5@-206.638,-192.269 ; -206.64,-193.562 NUM_LED.5@-205.774,-192.602 ; -206.64,-193.562 NUM_LED.5@-206.455,-192.283 ; -206.64,-193.562 NUM_LED.5@-205.917,-192.49 ; -206.64,-193.562 NUM_LED.5@-206.278,-192.321 ; -206.64,-193.562 NUM_LED.5@-206.091,-192.392 ; -206.64,-193.562 NUM_LED.5@-205.647,-192.733 ; -206.64,-193.562 NUM_LED.5@-206.638,-192.269 ; -206.64,-193.562 NUM_LED.5@-205.774,-192.602 ; -206.64,-193.562 NUM_LED.5@-206.455,-192.283 ; -206.64,-193.562 NUM_LED.5@-205.917,-192.49 ; -206.64,-193.562 NUM_LED.5@-206.278,-192.321 ; -206.64,-193.562 NUM_LED.5@-206.091,-192.392 ; -206.64,-193.562 NUM_LED.5@-205.647,-192.733 ; -206.64,-193.562 NUM_LED.5@-206.638,-192.269 ; -206.64,-193.562 NUM_LED.5@-205.774,-192.602 ; -206.64,-193.562 NUM_LED.5@-206.455,-192.283 ; -206.64,-193.562 NUM_LED.5@-205.917,-192.49 ; -206.64,-193.562 NUM_LED.5@-206.278,-192.321 ; -206.64,-193.562 NUM_LED.5@-206.091,-192.392 ; -206.64,-193.562 NUM_LED.5@-205.647,-192.733 ; -206.64,-193.562 NUM_LED.5@-206.638,-192.269 ; -206.64,-193.562 NUM_LED.5@-205.774,-192.602 ; -206.64,-193.562 NUM_LED.5@-206.455,-192.283 ; -206.64,-193.562 NUM_LED.5@-205.917,-192.49 ; -206.64,-193.562 NUM_LED.5@-206.278,-192.321 ; -206.64,-193.562 NUM_LED.5@-206.091,-192.392 ; -206.64,-193.562 NUM_LED.5@-205.647,-192.733 ; -206.64,-193.562 NUM_LED.5@-206.638,-192.269 ; -206.64,-193.562 NUM_LED.5@-205.774,-192.602 ; -206.64,-193.562 NUM_LED.5@-206.455,-192.283 ; -206.64,-193.562 NUM_LED.5@-205.917,-192.49 ; -206.64,-193.562 NUM_LED.5@-206.278,-192.321 ; -206.64,-193.562 NUM_LED.5@-206.091,-192.392 ; -206.64,-193.562 NUM_LED.5@-205.647,-192.733 ; -206.64,-193.562 NUM_LED.5@-206.638,-192.269 ; -206.64,-193.562 NUM_LED.5@-205.774,-192.602 ; -206.64,-193.562 NUM_LED.5@-206.455,-192.283 ; -206.64,-193.562 NUM_LED.5@-205.917,-192.49 ; -206.64,-193.562 NUM_LED.5@-206.278,-192.321 ; -206.64,-193.562 NUM_LED.5@-206.091,-192.392 ; -206.64,-193.562 NUM_LED.5@-205.647,-192.733 ; -206.64,-193.562 NUM_LED.5@-206.638,-192.269 ; -206.64,-193.562 NUM_LED.5@-205.774,-192.602 ; -206.64,-193.562 NUM_LED.5@-206.455,-192.283 ; -206.64,-193.562 NUM_LED.5@-205.917,-192.49 ; -206.64,-193.562 NUM_LED.5@-206.278,-192.321 ; -206.64,-193.562 NUM_LED.5@-206.091,-192.392 ; -206.64,-193.562 NUM_LED.5@-205.647,-192.733 ; -206.64,-193.562 NUM_LED.5@-206.638,-192.269 ; -206.64,-193.562 NUM_LED.5@-205.774,-192.602 ; -206.64,-193.562 NUM_LED.5@-206.455,-192.283 ; -206.64,-193.562 NUM_LED.5@-205.917,-192.49 ; -206.64,-193.562 NUM_LED.5@-206.278,-192.321 ; -206.64,-193.562 NUM_LED.5@-206.091,-192.392 ; -206.64,-193.562 NUM_LED.5@-205.647,-192.733 ; -206.64,-193.562 NUM_LED.5@-206.638,-192.269 ; -206.64,-193.562 NUM_LED.5@-205.774,-192.602 ; -206.64,-193.562 NUM_LED.5@-206.455,-192.283 ; -206.64,-193.562 NUM_LED.5@-205.917,-192.49 ; -206.64,-193.562 NUM_LED.5@-206.278,-192.321 ; -206.64,-193.562 NUM_LED.5@-206.091,-192.392 ; -206.64,-193.562 NUM_LED.5@-205.647,-192.733 ; -206.64,-193.562 NUM_LED.5@-206.638,-192.269 ; -206.64,-193.562 NUM_LED.5@-205.774,-192.602 ; -206.64,-193.562 NUM_LED.5@-206.455,-192.283 ; -206.64,-193.562 NUM_LED.5@-205.917,-192.49 ; -206.64,-193.562 NUM_LED.5@-206.278,-192.321 ; -206.64,-193.562 NUM_LED.5@-206.091,-192.392 ; -206.64,-193.562 NUM_LED.5@-205.647,-192.733 ; -206.64,-193.562 NUM_LED.5@-206.638,-192.269 ; -206.64,-193.562 NUM_LED.5@-205.774,-192.602 ; -206.64,-193.562 NUM_LED.5@-206.455,-192.283 ; -206.64,-193.562 NUM_LED.5@-205.917,-192.49 ; -206.64,-193.562 NUM_LED.5@-206.278,-192.321 ; -206.64,-193.562 NUM_LED.5@-206.091,-192.392 ; -206.64,-193.562 NUM_LED.5@-205.647,-192.733 ; -206.64,-193.562 NUM_LED.5@-206.638,-192.269 ; -206.64,-193.562 NUM_LED.5@-205.774,-192.602 ; -206.64,-193.562 NUM_LED.5@-206.455,-192.283 ; -206.64,-193.562 NUM_LED.5@-205.917,-192.49 ; -206.64,-193.562 NUM_LED.5@-206.278,-192.321 ; -206.64,-193.562 NUM_LED.5@-206.091,-192.392 ; -206.64,-193.562 NUM_LED.5@-205.647,-192.733 ; -206.64,-193.562 NUM_LED.5@-206.638,-192.269 ; -206.64,-193.562 NUM_LED.5@-205.774,-192.602 ; -206.64,-193.562 NUM_LED.5@-206.455,-192.283 ; -206.64,-193.562 NUM_LED.5@-205.917,-192.49 ; -206.64,-193.562 NUM_LED.5@-206.278,-192.321 ; -206.64,-193.562 NUM_LED.5@-206.091,-192.392 ; -206.64,-193.562 NUM_LED.5@-205.647,-192.733 ; -206.64,-193.562 NUM_LED.5@-206.638,-192.269 ; -206.64,-193.562 NUM_LED.5@-205.774,-192.602 ; -206.64,-193.562 NUM_LED.5@-206.455,-192.283 ; -206.64,-193.562 NUM_LED.5@-205.917,-192.49 ; -206.64,-193.562 NUM_LED.5@-206.278,-192.321 ; -206.64,-193.562 NUM_LED.5@-206.091,-192.392 ; -206.64,-193.562 NUM_LED.5@-205.647,-192.733 ; -206.64,-193.562 NUM_LED.5@-206.638,-192.269 ; -206.64,-193.562 NUM_LED.5@-205.774,-192.602 ; -206.64,-193.562 NUM_LED.5@-206.455,-192.283 ; -206.64,-193.562 NUM_LED.5@-205.917,-192.49 ; -206.64,-193.562 NUM_LED.5@-206.278,-192.321 ; -206.64,-193.562 NUM_LED.5@-206.091,-192.392 ; -206.64,-193.562 NUM_LED.5@-205.647,-192.733 ; -206.64,-193.562 NUM_LED.5@-206.638,-192.269 ; -206.64,-193.562 NUM_LED.5@-205.774,-192.602 ; -206.64,-193.562 NUM_LED.5@-206.455,-192.283 ; -206.64,-193.562 NUM_LED.5@-205.917,-192.49 ; -206.64,-193.562 NUM_LED.5@-206.278,-192.321 ; -206.64,-193.562 NUM_LED.5@-206.091,-192.392 ; -206.64,-193.562 NUM_LED.5@-205.647,-192.733 ; -206.64,-193.562 NUM_LED.5@-206.638,-192.269 ; -206.64,-193.562 NUM_LED.5@-205.774,-192.602 ; -206.64,-193.562 NUM_LED.5@-206.455,-192.283 ; -206.64,-193.562 NUM_LED.5@-205.917,-192.49 ; -206.64,-193.562 NUM_LED.5@-206.278,-192.321 ; -206.64,-193.562 NUM_LED.5@-206.091,-192.392 ; -206.64,-193.562 NUM_LED.5@-205.647,-192.733 ; -206.64,-193.562 NUM_LED.5@-206.638,-192.269 ; -206.64,-193.562 NUM_LED.5@-205.774,-192.602 ; -206.64,-193.562 NUM_LED.5@-206.455,-192.283 ; -206.64,-193.562 NUM_LED.5@-205.917,-192.49 ; -206.64,-193.562 NUM_LED.5@-206.278,-192.321 ; -206.64,-193.562 NUM_LED.5@-206.091,-192.392 ; -206.64,-193.562 NUM_LED.5@-205.647,-192.733 ; -206.64,-193.562 NUM_LED.5@-206.638,-192.269 ; -206.64,-193.562 NUM_LED.5@-205.774,-192.602 ; -206.64,-193.562 NUM_LED.5@-206.455,-192.283 ; -206.64,-193.562 NUM_LED.5@-205.917,-192.49 ; -206.64,-193.562 NUM_LED.5@-206.278,-192.321 ; -206.64,-193.562 NUM_LED.5@-206.091,-192.392 ; -206.64,-193.562 NUM_LED.5@-205.647,-192.733 ; -206.64,-193.562 NUM_LED.5@-206.638,-192.269 ; -206.64,-193.562 NUM_LED.5@-205.774,-192.602 ; -206.64,-193.562 NUM_LED.5@-206.455,-192.283 ; -206.64,-193.562 NUM_LED.5@-205.917,-192.49 ; -206.64,-193.562 NUM_LED.5@-206.278,-192.321 ; -206.64,-193.562 NUM_LED.5@-206.091,-192.392 ; -206.64,-193.562 NUM_LED.5@-205.647,-192.733 ; -206.64,-193.562 NUM_LED.5@-206.638,-192.269 ; -206.64,-193.562 NUM_LED.5@-205.774,-192.602 ; -206.64,-193.562 NUM_LED.5@-206.455,-192.283 ; -206.64,-193.562 NUM_LED.5@-205.917,-192.49 ; -206.64,-193.562 NUM_LED.5@-206.278,-192.321 ; -206.64,-193.562 NUM_LED.5@-206.091,-192.392 ; -206.64,-193.562 NUM_LED.5@-205.647,-192.733 ; -206.64,-193.562 NUM_LED.5@-206.638,-192.269 ; -206.64,-193.562 NUM_LED.5@-205.774,-192.602 ; -206.64,-193.562 NUM_LED.5@-206.455,-192.283 ; -206.64,-193.562 NUM_LED.5@-205.917,-192.49 ; -206.64,-193.562 NUM_LED.5@-206.278,-192.321 ; -206.64,-193.562 NUM_LED.5@-206.091,-192.392 ; -206.64,-193.562 NUM_LED.5@-205.647,-192.733 ; -206.64,-193.562 NUM_LED.5@-206.638,-192.269 ; -206.64,-193.562 NUM_LED.5@-205.774,-192.602 ; -206.64,-193.562 NUM_LED.5@-206.455,-192.283 ; -206.64,-193.562 NUM_LED.5@-205.917,-192.49 ; -206.64,-193.562 NUM_LED.5@-206.278,-192.321 ; -206.64,-193.562 NUM_LED.5@-206.091,-192.392 ; -206.64,-193.562 NUM_LED.5@-205.647,-192.733 ; -206.64,-193.562 NUM_LED.5@-206.638,-192.269 ; -206.64,-193.562 NUM_LED.5@-205.774,-192.602 ; -206.64,-193.562 NUM_LED.5@-206.455,-192.283 ; -206.64,-193.562 NUM_LED.5@-205.917,-192.49 ; -206.64,-193.562 NUM_LED.5@-206.278,-192.321 ; -206.64,-193.562 NUM_LED.5@-206.091,-192.392 ; -206.64,-193.562 NUM_LED.5@-205.647,-192.733 ; -206.64,-193.562 NUM_LED.5@-206.638,-192.269 ; -206.64,-193.562 NUM_LED.5@-205.774,-192.602 ; -206.64,-193.562 NUM_LED.5@-206.455,-192.283 ; -206.64,-193.562 NUM_LED.5@-205.917,-192.49 ; -206.64,-193.562 NUM_LED.5@-206.278,-192.321 ; -206.64,-193.562 NUM_LED.5@-206.091,-192.392 ; -206.64,-193.562 NUM_LED.5@-205.647,-192.733 ; -206.64,-193.562 NUM_LED.5@-206.638,-192.269 ; -206.64,-193.562 NUM_LED.5@-205.774,-192.602 ; -206.64,-193.562 NUM_LED.5@-206.455,-192.283 ; -206.64,-193.562 NUM_LED.5@-205.917,-192.49 ; -206.64,-193.562 NUM_LED.5@-206.278,-192.321 ; -206.64,-193.562 NUM_LED.5@-206.091,-192.392 ; -206.64,-193.562 NUM_LED.5@-205.647,-192.733 ; -206.64,-193.562 NUM_LED.5@-206.638,-192.269 ; -206.64,-193.562 NUM_LED.5@-205.774,-192.602 ; -206.64,-193.562 NUM_LED.5@-206.455,-192.283 ; -206.64,-193.562 NUM_LED.5@-205.917,-192.49 ; -206.64,-193.562 NUM_LED.5@-206.278,-192.321 ; -206.64,-193.562 NUM_LED.5@-206.091,-192.392 ; -206.64,-193.562 NUM_LED.5@-205.647,-192.733 ; -206.64,-193.562 NUM_LED.5@-206.638,-192.269 ; -206.64,-193.562 NUM_LED.5@-205.774,-192.602 ; -206.64,-193.562 NUM_LED.5@-206.455,-192.283 ; -206.64,-193.562 NUM_LED.5@-205.917,-192.49 ; -206.64,-193.562 NUM_LED.5@-206.278,-192.321 ; -206.64,-193.562 NUM_LED.5@-206.091,-192.392 ; -206.64,-193.562 NUM_LED.5@-205.647,-192.733 ; -206.64,-193.562 NUM_LED.5@-206.638,-192.269 ; -206.64,-193.562 NUM_LED.5@-205.774,-192.602 ; -206.64,-193.562 NUM_LED.5@-206.455,-192.283 ; -206.64,-193.562 NUM_LED.5@-205.917,-192.49 ; -206.64,-193.562 NUM_LED.5@-206.278,-192.321 ; -206.64,-193.562 NUM_LED.5@-206.091,-192.392 ; -206.64,-193.562 NUM_LED.5@-205.647,-192.733 ; -206.64,-193.562 NUM_LED.5@-206.638,-192.269 ; -206.64,-193.562 NUM_LED.5@-205.774,-192.602 ; -206.64,-193.562 NUM_LED.5@-206.455,-192.283 ; -206.64,-193.562 NUM_LED.5@-205.917,-192.49 ; -206.64,-193.562 NUM_LED.5@-206.278,-192.321 ; -206.64,-193.562 NUM_LED.5@-206.091,-192.392 ; -206.64,-193.562 NUM_LED.5@-205.647,-192.733 ; -206.64,-193.562 NUM_LED.5@-206.638,-192.269 ; -206.64,-193.562 NUM_LED.5@-205.774,-192.602 ; -206.64,-193.562 NUM_LED.5@-206.455,-192.283 ; -206.64,-193.562 NUM_LED.5@-205.917,-192.49 ; -206.64,-193.562 NUM_LED.5@-206.278,-192.321 ; -206.64,-193.562 NUM_LED.5@-206.091,-192.392 ; -206.64,-193.562 NUM_LED.5@-205.647,-192.733 ; -206.64,-193.562 NUM_LED.5@-206.638,-192.269 ; -206.64,-193.562 NUM_LED.5@-205.774,-192.602 ; -206.64,-193.562 NUM_LED.5@-206.455,-192.283 ; -206.64,-193.562 NUM_LED.5@-205.917,-192.49 ; -206.64,-193.562 NUM_LED.5@-206.278,-192.321 ; -206.64,-193.562 NUM_LED.5@-206.091,-192.392 ; -206.64,-193.562 NUM_LED.5@-205.647,-192.733 ; -206.64,-193.562 NUM_LED.5@-206.638,-192.269 ; -206.64,-193.562 NUM_LED.5@-205.774,-192.602 ; -206.64,-193.562 NUM_LED.5@-206.455,-192.283 ; -206.64,-193.562 NUM_LED.5@-205.917,-192.49 ; -206.64,-193.562 NUM_LED.5@-206.278,-192.321 ; -206.64,-193.562 NUM_LED.5@-206.091,-192.392 ; -206.64,-193.562 NUM_LED.5@-205.647,-192.733 ; -206.64,-193.562 NUM_LED.5@-206.638,-192.269 ; -206.64,-193.562 NUM_LED.5@-205.774,-192.602 ; -206.64,-193.562 NUM_LED.5@-206.455,-192.283 ; -206.64,-193.562 NUM_LED.5@-205.917,-192.49 ; -206.64,-193.562 NUM_LED.5@-206.278,-192.321 ; -206.64,-193.562 NUM_LED.5@-206.091,-192.392 ; -206.64,-193.562 NUM_LED.5@-205.647,-192.733 ; -206.64,-193.562 NUM_LED.5@-206.638,-192.269 ; -206.64,-193.562 NUM_LED.5@-205.774,-192.602 ; -206.64,-193.562 NUM_LED.5@-206.455,-192.283 ; -206.64,-193.562 NUM_LED.5@-205.917,-192.49 ; -206.64,-193.562 NUM_LED.5@-206.278,-192.321 ; -206.64,-193.562 NUM_LED.5@-206.091,-192.392 ; -206.64,-193.562 NUM_LED.5@-205.647,-192.733 ; -206.64,-193.562 NUM_LED.5@-206.638,-192.269 ; -206.64,-193.562 NUM_LED.5@-205.774,-192.602 ; -206.64,-193.562 NUM_LED.5@-206.455,-192.283 ; -206.64,-193.562 NUM_LED.5@-205.917,-192.49 ; -206.64,-193.562 NUM_LED.5@-206.278,-192.321 ; -206.64,-193.562 NUM_LED.5@-206.091,-192.392 ; -206.64,-193.562 NUM_LED.5@-205.647,-192.733 ; -206.64,-193.562 NUM_LED.5@-206.638,-192.269 ; -206.64,-193.562 NUM_LED.5@-205.774,-192.602 ; -206.64,-193.562 NUM_LED.5@-206.455,-192.283 ; -206.64,-193.562 NUM_LED.5@-205.917,-192.49 ; -206.64,-193.562 NUM_LED.5@-206.278,-192.321 ; -206.64,-193.562 NUM_LED.5@-206.091,-192.392 ; -206.64,-193.562 NUM_LED.5@-205.647,-192.733 ; -206.64,-193.562 NUM_LED.5@-206.638,-192.269 ; -206.64,-193.562 NUM_LED.5@-205.774,-192.602 ; -206.64,-193.562 NUM_LED.5@-206.455,-192.283